# Altium PCB Smart_Connect_Board.PcbDoc (part 5 of 5)
Units mil, origin at the board's own origin, x right, y up, seen from the top; angles counter-clockwise.
Board outline 3543.31 x 3149.61 mil, 2 copper layers (Top Layer, Bottom Layer), stack 61.811 mil thick; 211 components, 139 nets, 660 pads, 247 vias.
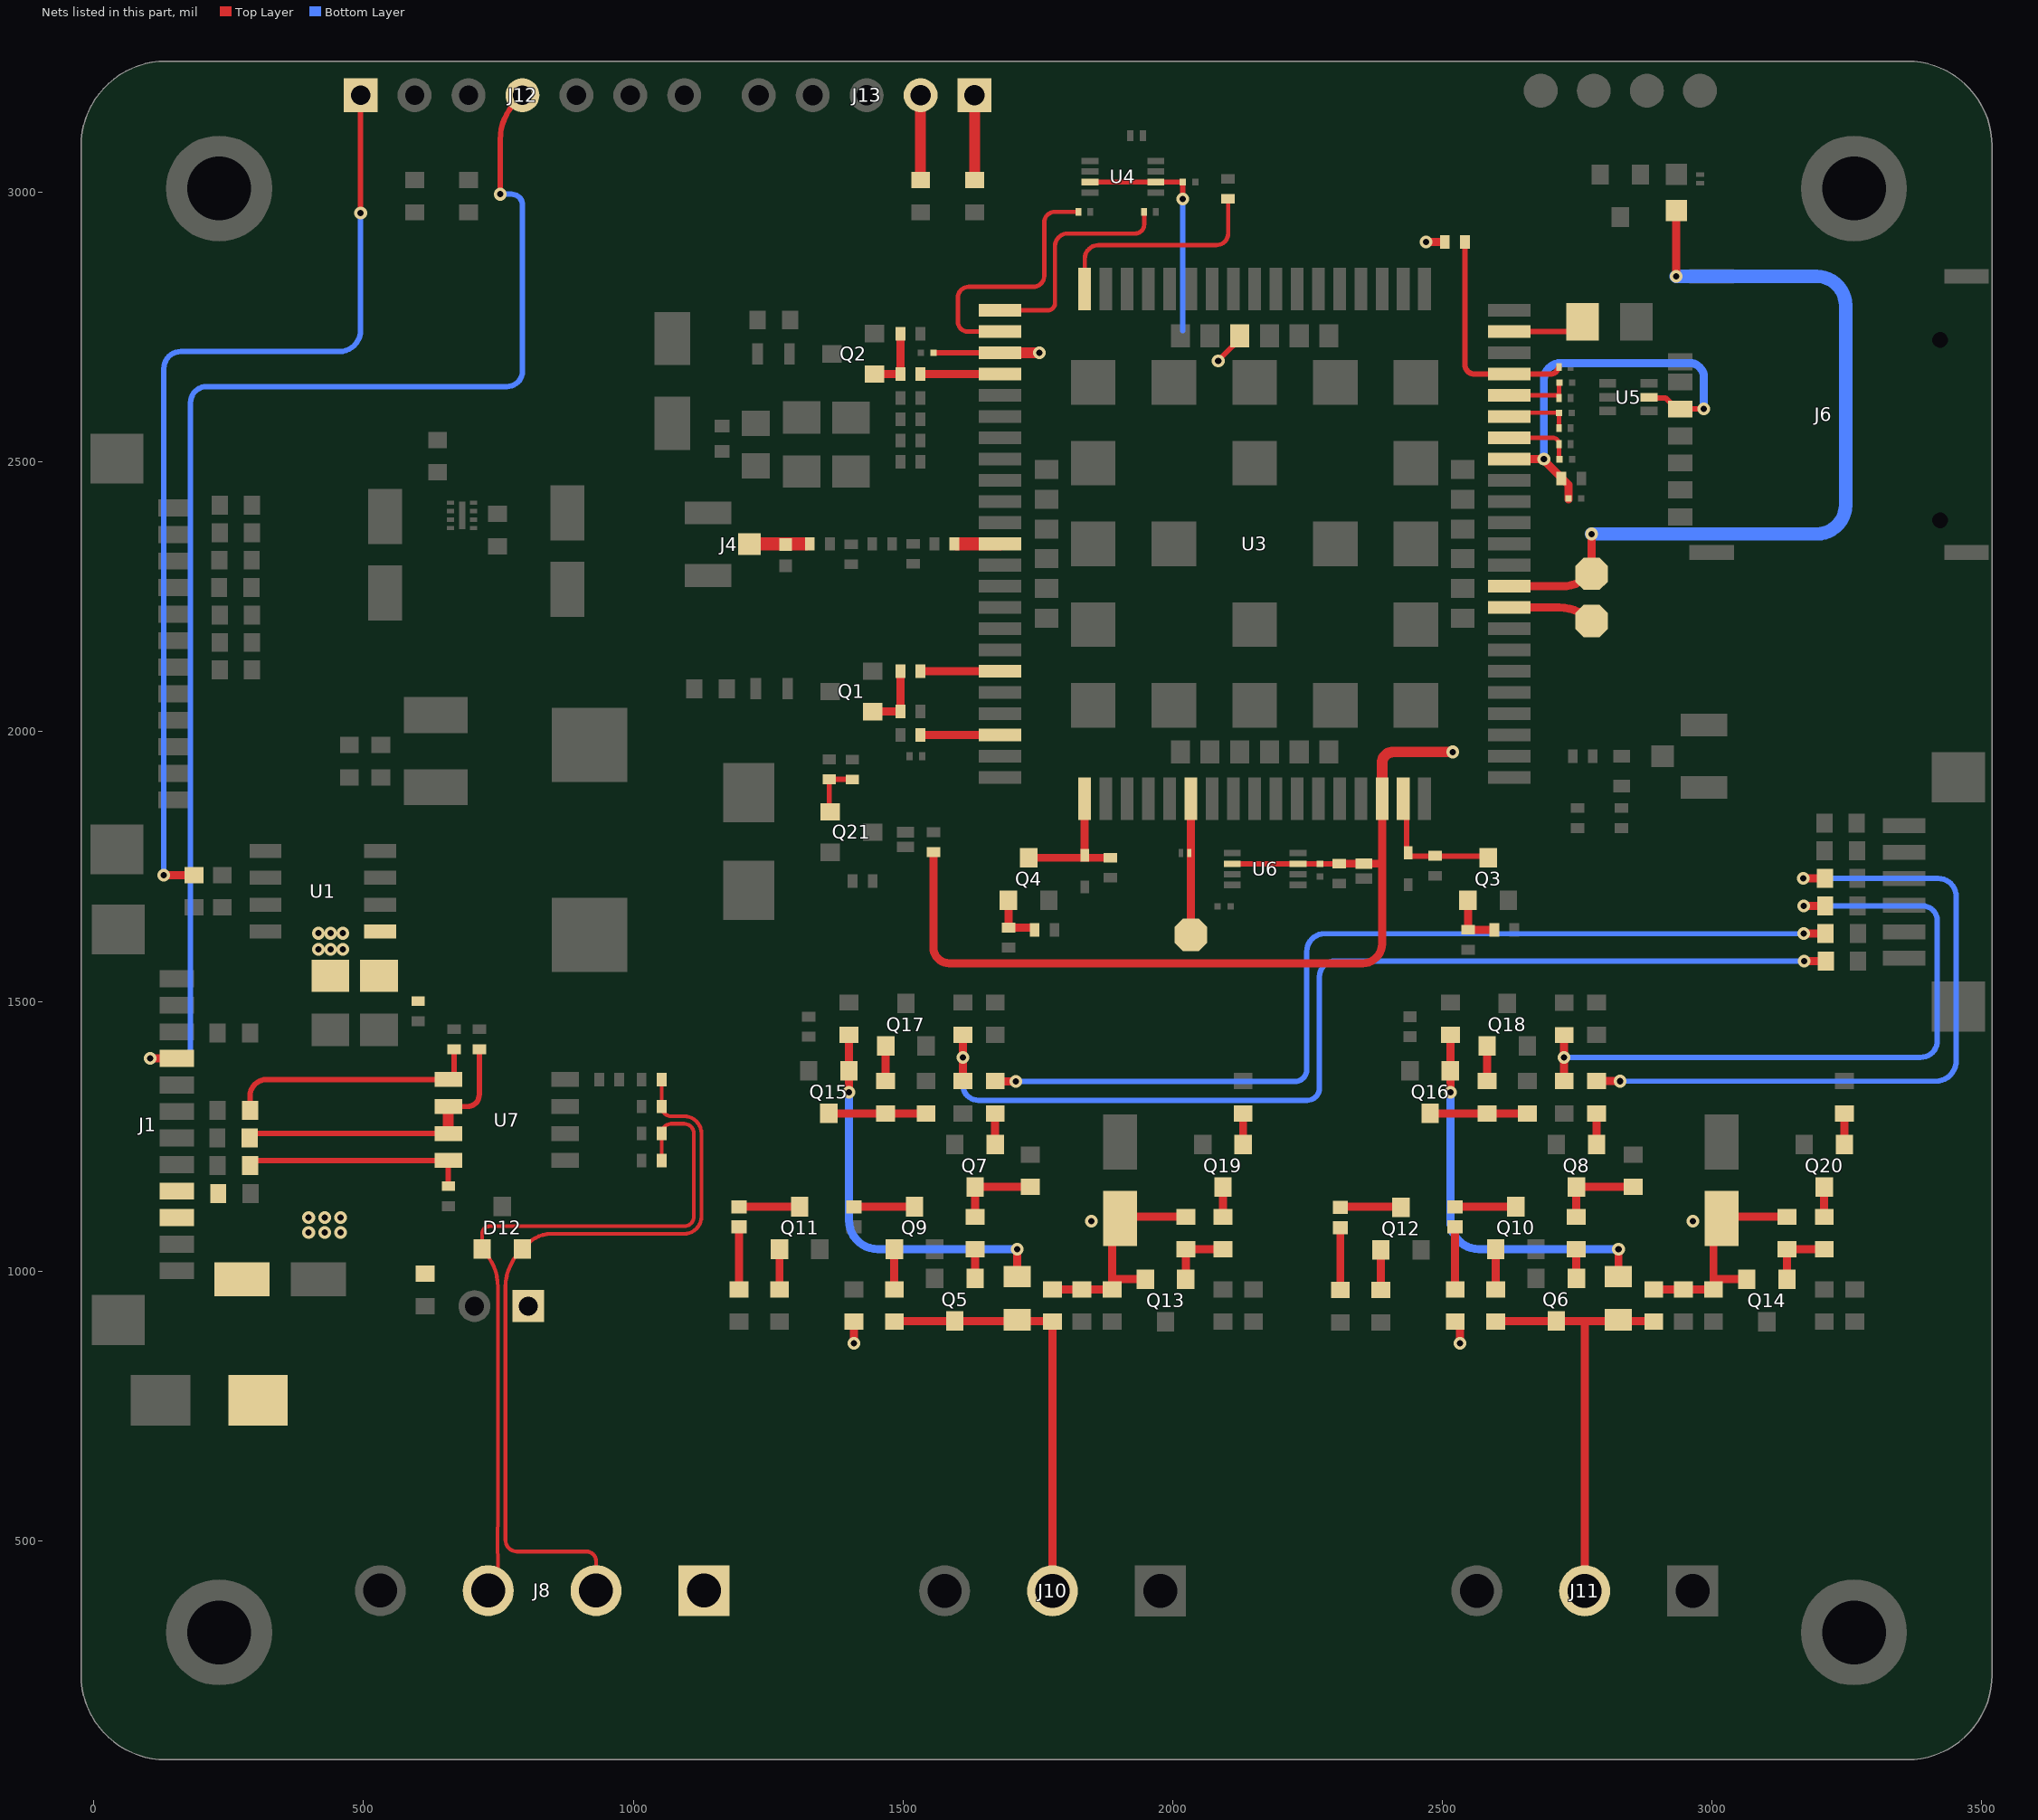
[diagram p3: the nets of this part, all layers, seen from the top]

## Via types
v1: diameter 23.62, hole 11.81, Top Layer to Bottom Layer, tented both sides, 233 vias
v2: diameter 23.62, hole 11.81, Top Layer to Bottom Layer, 14 vias

## Nets (pads, with @x,y where several pads share a name; then routed paths per layer and width w, separated by ;. In a path a pad name is that pad's centre, name@x,y a point inside that pad or via, vN(x,y) a via of type N, cw(c..) or ccw(c..) an arc to the next point about the centre after c; other vN are vias at no path point) (continued)
NetLED3_2: LED3.2 Q9.3 | length 112.6
  Top Layer w15: LED3.2@1409.04,1119.02 1409.15,1119.14 1521.45,1119.14 Q9.3@1521.56,1119.25
NetLED4_1: LED4.1 R55.2 | length 115.6
  Top Layer w15: R55.2@2524.04,966.02 LED4.1@2524.04,1081.63
NetLED4_2: LED4.2 Q10.3 | length 112.6
  Top Layer w15: LED4.2@2524.04,1119.03 2524.15,1119.14 2636.45,1119.14 Q10.3@2636.56,1119.25
NetLED5_1: LED5.1 R56.1 | length 115.6
  Top Layer w15: R56.1@1196.11,966.03 LED5.1@1196.1,1081.63
NetLED5_2: LED5.2 Q11.3 | length 112.6
  Top Layer w15: LED5.2@1196.1,1119.03 1196.21,1119.14 1308.53,1119.14 Q11.3@1308.64,1119.25
NetLED6_1: LED6.1 R57.1 | length 115.6
  Top Layer w15: R57.1@2311.11,966.03 LED6.1@2311.11,1081.62
NetLED6_2: LED6.2 Q12.3 | length 112.6
  Top Layer w15: LED6.2@2311.1,1119.03 2311.21,1119.14 2423.53,1119.14 Q12.3@2423.64,1119.25
NETLIGHT: R28.1 U3.52 | length 147.1
  Top Layer w15: R28.1@1532.56,2663.29 U3.52@1679.71,2663.29
NetQ1_1: Q1.1 R25.2 R26.2 | length 126.6
  Top Layer w15: Q1.1@1443.79,2037.31 R26.2@1495.56,2037.32 R25.2@1495.56,2112.11
NetQ2_1: Q2.1 R28.2 R29.2 | length 122.9
  Top Layer w15: Q2.1@1447.42,2663.29 R28.2@1495.56,2663.29 R29.2@1495.56,2738.09
NetQ3_1: Q3.1 R30.2 R31.2 | length 103.7
  Top Layer w15: Q3.1@2547.82,1687.59 R30.2@2547.82,1632.82 R31.2@2596.72,1632.82
NetQ4_1: Q4.1 R37.1 R38.2 | length 106.3
  Top Layer w15: R37.1@1695.74,1637.82 Q4.1@1695.74,1692.59 ; R37.1@1695.92,1636.99 1742.65,1636.99 1744.15,1635.49 R38.2@1744.15,1632.82
NetQ5_1: Q5.1 R58.1 | length 54.1
  Top Layer w15: Q5.1@1633.76,986.37 R58.1@1633.76,1040.51
NetQ6_1: Q6.1 R59.1 | length 54.1
  Top Layer w15: Q6.1@2748.76,986.37 R59.1@2748.76,1040.51
NetQ7_1: Q7.1 R50.1 | length 57.6
  Top Layer w15: Q7.1@1671.17,1234.76 R50.1@1671.17,1292.36
NetQ7_3: Q7.3 R51.2 R58.2 | length 158.1
  Top Layer w15: R58.2@1633.76,1100.51 Q7.3@1633.76,1156.02 R51.2@1736.32,1156.02
NetQ8_1: Q8.1 R52.1 | length 57.6
  Top Layer w15: Q8.1@2786.17,1234.76 R52.1@2786.17,1292.36
NetQ8_3: Q8.3 R53.2 R59.2 | length 158.1
  Top Layer w15: R59.2@2748.76,1100.51 Q8.3@2748.76,1156.02 R53.2@2851.32,1156.02
NetQ9_1: Q9.1 R60.1 | length 74.5
  Top Layer w15: R60.1@1484.16,966.02 Q9.1@1484.16,1040.51
NetQ10_1: Q10.1 R61.1 | length 74.5
  Top Layer w15: R61.1@2599.16,966.02 Q10.1@2599.16,1040.51
NetQ11_1: Q11.1 R62.1 | length 74.5
  Top Layer w15: R62.1@1271.23,966.02 Q11.1@1271.24,1040.51
NetQ12_1: Q12.1 R63.1 | length 74.5
  Top Layer w15: R63.1@2386.23,966.03 Q12.1@2386.23,1040.5
NetQ13_1: Q13.1 R64.1 R71.1 | length 124.7
  Top Layer w15: Q13.1@2024.44,984.76 R64.1@2024.44,1040.51 R71.1@2093.39,1040.51
NetQ14_1: Q14.1 R65.1 R73.1 | length 124.7
  Top Layer w15: Q14.1@3139.44,984.76 R65.1@3139.44,1040.51 R73.1@3208.39,1040.51
NetQ15_1: Q15.1 R66.1 R76.2 | length 737.1
  Top Layer w15: v1(1400.06,1331.73) Q15.1@1400.06,1371.1 R76.2@1400.06,1438.02 ; R66.1@1711.86,989.77 v1(1711.86,1040.51)
  Bottom Layer w15: v1(1400.06,1331.73) 1400.06,1093.98 ccw(c1453.53,1093.98) 1453.53,1040.51 v1(1711.86,1040.51)
NetQ15_3: Q15.3 R80.1 R82.2 | length 180.3
  Top Layer w15: Q15.3@1362.66,1292.36 R80.1@1468.12,1292.36 R82.2@1542.92,1292.36
NetQ16_1: Q16.1 R67.1 R78.2 | length 737.1
  Top Layer w15: v1(2515.06,1331.73) Q16.1@2515.06,1371.09 R78.2@2515.06,1438.02 ; R67.1@2826.86,989.77 v1(2826.86,1040.51)
  Bottom Layer w15: v1(2515.06,1331.73) 2515.06,1093.98 ccw(c2568.53,1093.98) 2568.53,1040.51 v1(2826.86,1040.51)
NetQ16_3: Q16.3 R81.1 R83.2 | length 180.3
  Top Layer w15: Q16.3@2477.65,1292.35 R81.1@2583.12,1292.36 R83.2@2657.91,1292.36
NetQ17_1: Q17.1 R80.2 | length 65.3
  Top Layer w15: R80.2@1468.12,1352.36 Q17.1@1468.12,1417.67
NetQ18_1: Q18.1 R81.2 | length 65.3
  Top Layer w15: R81.2@2583.12,1352.36 Q18.1@2583.12,1417.67
NetQ19_1: Q19.1 R70.1 | length 57.6
  Top Layer w15: Q19.1@2130.8,1234.76 R70.1@2130.8,1292.36
NetQ19_3: Q19.3 R71.2 | length 55.5
  Top Layer w15: R71.2@2093.39,1100.51 Q19.3@2093.4,1156.02
NetQ20_1: Q20.1 R72.1 | length 57.6
  Top Layer w15: Q20.1@3245.8,1234.76 R72.1@3245.8,1292.36
NetQ20_3: Q20.3 R73.2 | length 55.5
  Top Layer w15: R73.2@3208.39,1100.51 Q20.3@3208.4,1156.02
NetQ21_1: Q21.1 R90.2 R91.2 | length 104.6
  Top Layer w10: Q21.1@1365.05,1851.28 cw(c1365.05,1852.91) 1363.42,1852.91 R90.2@1363.42,1911.78 1406.26,1911.78 R91.2@1406.26,1911.39
NetR20_1: R20.1 U3.98 | length 147.1
  Top Layer w15: R20.1@1532.56,1994 U3.98@1679.71,1994
NetR21_1: R21.1 U3.96 | length 490
  Top Layer w8: U3.96@1679.71,2742.03 1619.97,2742.03 cw(c1619.97,2760) 1602,2760 1602,2805 cw(c1622,2805) 1622,2825 1742,2825 ccw(c1742,2845) 1762,2845 1762,2944.06 cw(c1782,2944.06) 1782,2964.06 R21.1@1825.72,2964.06
NetR22_1: R22.1 U3.95 | length 420
  Top Layer w8: U3.95@1679.71,2781.4 1768.4,2781.4 ccw(c1768.4,2795) 1782,2795 1782,2900.27 cw(c1805.54,2900.27) 1805.54,2923.81 1930.89,2923.81 ccw(c1930.89,2940.27) 1947.35,2940.27 1947.35,2956.77
NetR92_2: R92.2 U3.93 | length 117.4
  Top Layer w10: U3.93@2624.59,2742.03 R92.2@2742.02,2742.03
NetR95_2: R95.2 U3.51 | length 412.9
  Top Layer w8: U3.51@1837.19,2820.77 1837.19,2876.78 cw(c1862.7,2876.78) 1862.7,2902.29 2081.5,2902.29 ccw(c2081.5,2923.81) 2103.02,2923.81 R95.2@2103.01,2988.06
PWRKEY: C30.2 D11.2 Q4.3 U3.1 | length 261.3
  Top Layer w15: Q4.3@1733.15,1766.33 D11.2@1836.15,1766.33 ; U3.1@1837.19,1875.89 1837.19,1768.84 cw(c1833.64,1768.84) D11.2@1836.15,1766.33 ; C30.2@1884.63,1766.33 1837.19,1766.33 D11.2@1836.15,1766.33
RE/DE/RS485/T: R12.1 R40.1 U7.2 U7.3 | length 577.2
  Top Layer w10: R12.1@288.85,1246.67 cw(c297.24,1246.67) 297.24,1255.05 U7.3@657.23,1255.05 ; U7.2@657.23,1305.05 692.5,1305.05 ccw(c692.5,1327.05) 714.5,1327.05 R40.1@714.5,1411.28
  Top Layer w20: U7.3@657.23,1255.05 U7.2@657.23,1305.05
RF_ANT: C47.2 U3.60 | length 80.4
  Top Layer w25: C47.2@1599.3,2348.33 U3.60@1679.71,2348.33
RF_ANT_O: D4.2 J4.1 R93.1 | length 107.4
  Top Layer w10: D4.2@1282.68,2347.28 cw(c1283.74,2347.28) D4.2@1283.74,2348.33
  Top Layer w25: J4.1@1215.5,2348.33 1283.74,2348.33 R93.1@1321.26,2348.33
RS485_N: D12.2 J8.2 J9.1 R43.2 R44.2 | length 1474.5
  Top Layer w7: J9.1@794.47,946.16 ccw(c805.57,946.16) J9.1@805.57,935.05 ; J8.2@931.04,407.34 931.04,462.05 ccw(c913.16,462.05) 913.16,479.92 784.28,479.92 cw(c784.28,501.17) 763.04,501.17 763.04,969.89 cw(c858.07,969.89) 790.87,1037.09 D12.2@794.47,1040.69 804.85,1051.07 cw(c848.17,1007.75) 848.17,1069.01 1094.35,1069.01 ccw(c1094.35,1101.05) 1126.39,1101.05 1126.39,1255.05 ccw(c1094.38,1255.05) 1094.38,1287.05 1082.47,1287.05 1070.56,1287.05 cw(c1070.56,1305.05) R44.2@1052.56,1305.05 ; R44.2@1052.56,1307.15 R43.2@1052.56,1355.05
RS485_P: D12.1 J8.3 R45.1 R46.2 R47.1 | length 1369.8
  Top Layer w7: J8.3@731.04,407.34 ccw(c687.58,450.79) 749.04,450.79 748.52,501.95 cw(c762.52,502.1) 748.52,502.1 748.52,521.58 cw(c762.52,521.58) 748.56,522.66 749.02,528.52 ccw(c742.04,529.02) 749.04,529.02 749.04,969.89 ccw(c649.04,969.89) 719.75,1040.6 D12.1@719.66,1040.69 719.66,1069.01 cw(c733.66,1069.01) 733.66,1083.01 1094.35,1083.01 ccw(c1094.35,1101.05) 1112.39,1101.05 1112.39,1255.05 ccw(c1094.38,1255.05) 1094.38,1273.05 1070.56,1273.05 ccw(c1070.56,1255.05) R46.2@1052.56,1255.05 R47.1@1052.56,1205.05
RST_GSM: C24.2 D9.2 Q3.3 U3.16 | length 261.2
  Top Layer w10: U3.16@2427.74,1875.89 2434.05,1869.57 2434.05,1770.78 2435.7,1769.13 2486.98,1769.13 2582.41,1769.13 cw(c2582.41,1766.33) Q3.3@2585.22,1766.33
RX_AUX: J13.2 R86.1 | length 157.2
  Top Layer w20: R86.1@1532.78,3023.03 J13.2@1532.78,3180.22
RXD/RS485/RS232/T: R9.1 R39.1 U7.1 | length 474
  Top Layer w10: R9.1@289.36,1297.88 289.36,1324.71 cw(c319.7,1324.71) 319.7,1355.05 U7.1@657.23,1355.05 667.5,1361.33 R39.1@667.5,1411.28
RXIN1: R11.1 R74.2 R77.2 | length 1989.2
  Top Layer w15: R77.2@1611.17,1352.36 R74.2@1611.18,1438.02 ; v1(3171.02,1574.77) v1(3171.02,1574.77) R11.1@3211.19,1574.85
  Bottom Layer w10: v1(1611.17,1396.11) 1611.17,1345.14 ccw(c1639.81,1345.14) 1639.81,1316.5 2249.51,1316.5 ccw(c2249.51,1339.45) 2272.46,1339.45 2272.46,1546.21 cw(c2301.02,1546.21) 2301.02,1574.77 v1(3171.02,1574.77)
RXIN2: R16.1 R75.2 R79.2 | length 1321.6
  Top Layer w15: R79.2@2726.18,1352.36 R75.2@2726.18,1438.02 ; v1@3170,1677.02 R16.1@3210.18,1677.02
  Bottom Layer w10: v1(2726.17,1396.11) 3386.91,1396.11 ccw(c3386.91,1427.29) 3418.09,1427.29 3418.09,1649.55 ccw(c3390.63,1649.55) 3390.63,1677.02 v1@3170,1677.02
  other v1: 3170,1676.94
SCK_NFC: J12.1 R1.1 | length 1836.5
  Top Layer w10: v1(494.54,2961.71) J12.1@494.54,3180.22
  Top Layer w15: v2(129.52,1734.2) R1.1@185.54,1734.23
  Bottom Layer w10: v2(129.52,1734.2) 129.52,2673.11 cw(c161.41,2673.11) 161.41,2705 455,2705 ccw(c455,2744.54) 494.54,2744.54 v1(494.54,2961.71)
SIM_CD: R32.2 R33.2 U3.34 | length 418.1
  Top Layer w10: R32.2@2542.06,2908.28 2542.06,2680.85 ccw(c2559.63,2680.85) 2559.63,2663.29 U3.34@2624.59,2663.29 2701.57,2663.29 ccw(c2701.57,2676.29) 2712.85,2669.82 2716.29,2675.74 R33.2@2716.6,2676.29
SIM_CLK: C28.2 R35.2 U3.32 | length 124.5
  Top Layer w8: U3.32@2624.59,2584.55 cw(c2631.4,2584.55) 2631.4,2591.36 C28.2@2716.6,2591.36 R35.2@2716.6,2562.78
SIM_DATA: C27.2 R36.2 U3.31 | length 127.1
  Top Layer w8: U3.31@2624.59,2545.18 2704.6,2545.18 cw(c2704.6,2533.18) R36.2@2716.6,2533.18 2716.6,2507.63 ccw(c2720.07,2507.63) C27.2@2717.62,2505.17
SIM_RST: C29.2 R34.2 U3.33 | length 123.8
  Top Layer w8: U3.33@2624.59,2623.92 2711.6,2623.92 cw(c2711.6,2618.92) R34.2@2716.6,2618.92 2716.6,2646.26 cw(c2717.62,2646.26) C29.2@2717.62,2647.27
SIM_VDD: C23.1 C43.2 J6.C1 U3.30 U5.5 | length 804.1
  Top Layer w10: U5.5@2883.32,2620.29 2884.52,2619.1 2914.07,2619.1 2934.79,2598.37 J6.C1@2941.49,2598.37 v2(2985.25,2598.37)
  Top Layer w15: U3.30@2624.59,2505.81 v1(2688.52,2505.81) 2688.52,2503.47 2698.21,2493.78 2698.21,2493.68 2734.32,2457.56 C23.1@2734.32,2430.7
  Bottom Layer w15: v1(2688.52,2505.81) 2688.52,2652.4 cw(c2719.69,2652.4) 2719.69,2683.57 2959.16,2683.57 cw(c2959.16,2657.48) 2985.25,2657.48 v2(2985.25,2598.37)
SS_NFC: J1.4 J12.4 | length 2538
  Top Layer w10: v2(753.33,2996.65) 753.33,3097.59 cw(c853.33,3097.59) 782.62,3168.3 J12.4@794.54,3180.22
  Top Layer w15: v1(104,1394.3) J1.4@153.68,1394.3
  Bottom Layer w10: v1(104,1394.3) 159.37,1394.3 ccw(c159.37,1414.08) 179.15,1414.08 179.15,2610.15 cw(c209,2610.15) 209,2640 765.82,2640 ccw(c765.82,2668.72) 794.54,2668.72 794.54,2976.78 ccw(c774.66,2976.78) 774.66,2996.65 v2(753.33,2996.65)
STATUS: R25.1 U3.66 | length 147.2
  Top Layer w15: R25.1@1532.56,2112.11 U3.66@1679.71,2112.11
TX_AUX: J13.1 R88.1 | length 157.2
  Top Layer w20: R88.1@1632.78,3023.03 J13.1@1632.78,3180.22
TXD/RS485/RS232/T: R15.1 R42.1 U7.4 | length 421.1
  Top Layer w10: R15.1@289.36,1195.45 cw(c298.96,1195.45) 298.96,1205.05 U7.4@657.23,1205.05 R42.1@657.23,1157.28
TXIN1: R14.1 R50.2 | length 1790.5
  Top Layer w15: R50.2@1671.17,1352.36 1671.71,1351.82 1708.96,1351.82 v1(1709.5,1351.28) ; v1(3170.51,1625.86) R14.1@3210.68,1625.93
  Bottom Layer w10: v1(1709.5,1351.28) 2226.66,1351.28 ccw(c2226.66,1373.31) 2248.69,1373.31 2248.69,1592.35 cw(c2281.74,1592.35) 2281.74,1625.41 v1@3170.51,1625.41
TXIN2: R17.1 R52.2 | length 1336.2
  Top Layer w15: R52.2@2786.17,1352.36 2786.36,1352.17 2829.88,1352.17 v1(2830.07,1351.98) ; v1@3169.49,1728.1 R17.1@3209.67,1728.1
  Bottom Layer w10: v1(2830.07,1351.98) 3415.03,1351.98 ccw(c3415.03,1390.04) 3453.09,1390.04 3453.09,1694.56 ccw(c3419.63,1694.56) 3419.63,1728.03 v1(3169.49,1728.03)
UART_LOG_TX: P3.1 U3.23 | length 159.2
  Top Layer w15: U3.23@2624.59,2230.22 2716.79,2230.22 cw(c2716.79,2144.86) P3.1@2777.15,2205.22
USB_BOOT: D13.2 P2.1 U3.6 | length 252.6
  Top Layer w15: P2.1@2034.04,1623.33 U3.6@2034.04,1875.89
USB_VBUS: F1.1 P1.1 U3.24 | length 1570.7
  Top Layer w15: U3.24@2624.59,2269.59 2721.14,2269.59 ccw(c2721.14,2348.78) P1.1@2777.15,2292.78 v1(2777.15,2366.73) ; v1(2934.08,2844.44) F1.1@2934.08,2966.23
  Bottom Layer w25: v1(2777.15,2366.73) 3194.28,2366.73 ccw(c3194.28,2420.49) 3248.03,2420.49 3248.03,2790.3 ccw(c3193.9,2790.3) 3193.9,2844.44 v1(2934.08,2844.44)
VCC: C4.2 C5.2 C6.2 C7.2 C8.1 C36.1 C37.1 C38.2 C39.2 D2.2 J1.9 J1.10 J8.1 Q13.2 Q14.2 R48.1 R49.1 R54.1 R55.1 R64.2 R65.2 SB1.2 SB2.2 U1.1 | length 940
  Top Layer w15: v1(1409.04,866.28) R54.1@1409.04,906.02 ; R48.1@1777.35,966.02 SB1.2@1888.03,966.02 1888.03,986.02 ; Q13.2@1949.64,984.76 1889.28,984.76 1888.03,986.02 ; R64.2@2024.44,1100.51 1911.02,1100.51 1903.04,1092.53 1888.03,1077.52 1888.03,986.02 ; v1(2533.04,866.28) R55.1@2533.04,906.02 ; R49.1@2892.35,966.02 SB2.2@3003.03,966.02 3003.03,986.02 ; Q14.2@3064.63,984.76 3004.28,984.76 3003.03,986.02 ; R65.2@3139.44,1100.51 3026.02,1100.51 3003.03,1077.52 3003.03,986.02
  other v1: 398.1,1071.6 427.6,1071.6 457.1,1071.6 1849.54,1092.53 2964.54,1092.53 398.1,1099.1 427.6,1099.1 457.1,1099.1 416.16,1596.78 438.66,1596.78 461.16,1596.78 416.16,1626.28 438.66,1626.28 461.16,1626.28
VDD_EXT: C13.1 C21.1 C25.2 C31.1 D6.1 R32.1 R41.2 U3.15 U3.97 U3.116 U4.3 U4.6 U6.3 U6.6 | length 2542.9
  Top Layer w10: C21.1@1556.86,2702.66 U3.97@1679.71,2702.66 ; U4.3@1846.95,3019.21 U4.6@1969,3019.21 C25.2@2018.95,3019.21 v2(2018.95,2988.06) ; v1@2084.67,2686.83 v1(2084.67,2687.83) 2084.67,2688.38 2111.87,2715.58 2111.87,2721.44 U3.116@2124.59,2734.15 ; U6.6@2110.81,1755.36 2208.76,1755.36 ; 2209.76,1755.36 U6.3@2232.85,1755.36 C31.1@2273.41,1755.36 C13.1@2309.13,1755.36 C13.1@2320.13,1755.36
  Top Layer w15: R41.2@1556.46,1776.87 1556.46,1600.06 ccw(c1585.73,1600.06) 1585.73,1570.79 2352.88,1570.79 ccw(c2352.88,1606.28) 2388.37,1606.28 2388.37,1755.36 ; C13.1@2320.13,1755.36 2388.37,1755.36 ; U3.15@2388.37,1875.89 2388.37,1755.36 ; v1(2470.17,2908.28) R32.1@2505.06,2908.28
  Top Layer w20: U3.97@1679.71,2702.66 v1(1753.12,2702.66) ; U3.15@2388.37,1875.89 2388.37,1941.38 cw(c2409.49,1941.38) 2409.49,1962.5 v1(2519.56,1962.5)
  Bottom Layer w10: 2018.95,2744 v2(2018.95,2988.06)
WBUS1: J10.2 Q5.3 R48.2 R60.2 R66.2 | length 792.6
  Top Layer w15: R60.2@1484.16,906.83 1711.86,906.83 1776.55,906.83 R48.2@1777.35,906.02 J10.2@1777.35,406.98
WBUS2: J11.2 Q6.3 R49.2 R61.2 R67.2 | length 793.4
  Top Layer w15: R61.2@2599.16,906.83 2764.24,906.83 ; J11.2@2764.24,406.98 2764.24,906.83 ; R49.2@2892.35,906.02 2891.55,906.83 2764.24,906.83
pads on no net: J2.8 J6.C6 J6.MH U3.3 U3.4 U3.5 U3.7 U3.8 U3.11 U3.12 U3.13 U3.14 U3.19 U3.20 U3.21 U3.22 U3.25 U3.26 U3.35 U3.36 U3.37 U3.38 U3.40 U3.41 U3.42 U3.43 U3.44 U3.47 U3.48 U3.49 U3.50 U3.53 U3.67 U3.68 U3.100 U3.101 U3.102 U3.103 U3.104 U3.105 U3.106 U3.107 U3.108 U3.109 U3.110 U3.111 U3.112 U3.113 U3.114 U3.115 U3.117 U3.118 U3.119 U3.120 U3.121 U3.122 U3.123 U3.124

## Polygon pours and split planes (outlines as drawn)
GND on Bottom Layer "NONET_L-01_P-001" (solid, remove dead copper, pour order 16): -23.91,251.26 -23.91,3085.91 cw(c133.57,3085.91) 133.57,3243.39 3361.92,3243.39 cw(c3361.92,3085.91) 3519.4,3085.91 3519.4,251.26 cw(c3361.92,251.26) 3361.92,93.78 133.57,93.78 cw(c133.57,251.26)
3V3 on Bottom Layer "NONET_L-01_P-001" (solid, remove dead copper, pour order 15): 469.77,1835.27 225.91,1835.27 225.91,1294 69,1294 69,2728 494.54,2728 494.54,3026 943.95,3026 943.95,3243.39 -23.91,3243.39 -23.91,1154 359,1154 359,1701.27 420,1701.27
VCC on Bottom Layer "NONET_L-01_P-001" (solid, pour order 8): 400.38,1653.08 ccw(c400.38,1622.84) 370.13,1622.84 370.13,1224.24 370.13,1003.08 506.95,1003.08 506.95,1617.87 ccw(c471.74,1617.87) 471.73,1653.08
VDD_EXT on Bottom Layer "NONET_L-01_P-001" (solid, pour order 12): 2546.29,2944.28 cw(c2546.29,2918.1) 2572.46,2918.1 2572.46,2770.28 2572.46,1942.28 cw(c2546.46,1942.27) 2546.46,1916.28 2502.46,1916.28 cw(c2502.46,1940.27) 2478.46,1940.28 2478.46,2650.28 ccw(c2452.46,2650.28) 2452.46,2676.28 1723.15,2676.28 cw(c1723.15,2699.94) 1699.48,2699.94 1699.48,2741.73 cw(c1722.03,2741.73) 1722.03,2764.28 2371.1,2764.28 ccw(c2371.1,2793.35) 2400.18,2793.35 2400.18,2920 cw(c2424.46,2920) 2424.46,2944.28
GND on Top Layer "NONET_L-01_P-001" (solid, remove dead copper, pour order 17): -23.91,251.26 -23.91,3085.91 cw(c133.57,3085.91) 133.57,3243.39 3361.92,3243.39 cw(c3361.92,3085.91) 3519.4,3085.91 3519.4,251.26 cw(c3361.92,251.26) 3361.92,93.78 133.57,93.78 cw(c133.57,251.26)
VCC on Top Layer "NONET_L-01_P-001" (solid, remove dead copper, pour order 14): 481,1116.08 481,1029.72 346.7,1029.72 346.7,943.36 393.31,943.36 393.31,343.69 ccw(c452,343.69) 452,285 1022,285 ccw(c1022,330) 1067,330 1067,456.28 1262,456.28 1262,93.78 133.57,93.78 cw(c133.57,251.26) -23.91,251.26 -23.91,654.28 178.31,654.28 ccw(c178.31,697.79) 221.82,697.79 221.82,1042.85 ccw(c181.39,1042.85) 181.39,1083.28 121.8,1083.28 121.79,1163.99 265.36,1163.99 265.36,1116.08

## Other copper
Top Layer:
  rectangle net RS485_N: 800.87,935.05 807.87,1037.09
  rectangle net 3V3_GSM: 654.25,2348.16 667.84,2381.46
  rectangle net GSM_PWR: 635.92,2389.33 667.84,2397.2
  rectangle net GND: 676.69,2364.98 710.95,2378.2
  rectangle net GND: 687.96,2332.55 697.36,2368.62
  region net 3V3: 781.21,3009.12 781.21,3130.48 787.76,3128.72 801.32,3128.72 814.42,3132.23 826.16,3139.01 835.75,3148.6 842.53,3160.34 846.03,3173.44 846.03,3187 842.53,3200.1 835.75,3211.84 826.16,3221.43 821.25,3224.26 823.13,3231.26 965.95,3231.26 967.82,3224.26 962.92,3221.43 953.33,3211.84 946.55,3200.1 943.04,3187 943.04,3173.44 946.55,3160.34 953.33,3148.6 962.92,3139.01 974.66,3132.23 987.76,3128.72 1001.32,3128.72 1014.42,3132.23 1026.16,3139.01 1035.75,3148.6 1040.5,3156.83 1048.58,3156.83 1053.33,3148.6 1062.92,3139.01 1074.66,3132.23 1079.2,3131.02 1079.2,3097.97 1079.31,3097.39 1077.69,3089.23 1072.74,3081.82 1065.33,3076.87 1057.18,3075.25 1056.59,3075.37 856.53,3075.37 853.33,3078.56 845.31,3081.88 836.64,3081.88 828.62,3078.56 822.49,3072.43 819.16,3064.41 819.16,3055.73 822.49,3047.72 828.62,3041.58 836.64,3038.26 845.31,3038.26 853.33,3041.58 856.53,3044.78 1056.59,3044.78 1056.59,3044.62 1070.4,3046.43 1083.27,3051.76 1094.32,3060.24 1102.8,3071.29 1108.13,3084.16 1109.95,3097.97 1109.79,3097.97 1109.79,3130.99 1114.42,3132.23 1126.16,3139.01 1135.75,3148.6 1142.53,3160.34 1143.75,3164.92 1183.57,3164.92 1184.79,3160.34 1191.57,3148.6 1201.16,3139.01 1212.9,3132.23 1226,3128.72 1239.56,3128.72 1252.66,3132.23 1264.4,3139.01 1273.99,3148.6 1278.74,3156.83 1286.82,3156.83 1291.57,3148.6 1301.16,3139.01 1312.9,3132.23 1326,3128.72 1339.56,3128.72 1352.66,3132.23 1364.4,3139.01 1373.99,3148.6 1380.77,3160.34 1384.28,3173.44 1384.28,3187 1380.77,3200.1 1373.99,3211.84 1364.4,3221.43 1359.5,3224.26 1361.37,3231.26 1480.73,3231.26 1480.73,3009.12
  region net 3V3: 987.88,2042.16 988.97,2042.16 988.97,1714.28 450.3,1714.28 444.72,1715.38 439.47,1717.56 434.74,1720.72 430.72,1724.74 427.56,1729.47 425.39,1734.72 424.28,1740.3 424.28,1743.14 424.28,1914.9 424.28,1917.6 425.33,1922.9 427.4,1927.89 430.4,1932.38 434.22,1936.2 438.71,1939.21 443.71,1941.27 449.01,1942.33 816.1,1942.33 819.34,1942.49 825.71,1943.75 831.7,1946.24 837.1,1949.85 841.69,1954.44 845.3,1959.83 847.78,1965.83 849.05,1972.2 849.21,1975.44 849.21,2042.34 986.96,2042.34 hole: 552.19,1844.82 543.51,1844.82 535.49,1841.5 529.36,1835.37 526.04,1827.35 526.04,1818.68 529.36,1810.66 530.01,1810.01 530.01,1802.26 491.05,1802.26 491.05,1756.28 570.1,1756.28 570.1,1802.26 565.69,1802.26 565.69,1810.01 566.34,1810.66 569.66,1818.68 569.66,1827.35 566.34,1835.37 560.2,1841.5
  region net RS485_P: 612.33,999.39 701.02,999.39 ccw(c701.02,1005.26) 706.89,1005.26 706.89,1040.69 713.89,1040.69 713.89,1004.85 cw(c701.43,1004.85) 701.43,992.39 616.94,992.39 cw(c616.94,995.05) 614.28,995.05 614.28,997.45 ccw(c612.33,997.45)
  region net VCC: 631.64,1509.22 cw(c613.69,1509.22) 613.69,1491.28 404.58,1491.28 404.58,1642.26 500.98,1642.26 631.64,1642.26
  region net NetD1_2: 1223.31,1554.18 ccw(c1223.36,1592.15) 1261.33,1592.21 1261.33,1784.19 1009.46,1784.19 1009.46,1697.28 501.05,1697.28 501.05,1656.28 646.43,1656.28 646.43,1554.18 754.56,1554.18
  region net VCC: 3156.94,1085.51 cw(c3145.81,1085.51) 3145.81,1074.37 3099.45,1074.37 ccw(c3099.39,1060.88) 3085.9,1060.94 3085.9,967.89 cw(c3069.03,967.89) 3069.03,951.02 2874.85,951.02 2874.85,981.02 2914.72,981.02 ccw(c2914.72,995.85) 2929.54,995.85 2929.54,1126.21 cw(c2947.04,1126.21) 2947.04,1143.71 3144.57,1143.71 cw(c3144.58,1131.34) 3156.94,1131.34
  region net 3V3_GSM: 620.01,2414.75 ccw(c620.01,2409.47) 614.73,2409.47 614.84,2404.04 557.81,2404.04 555.76,2403.83 551.98,2402.27 549.38,2399.67 549.08,2399.37 547.51,2395.58 547.31,2393.53 547.31,2338.12 547.31,2335.97 545.66,2331.98 542.6,2328.93 536.46,2327.28 429.46,2327.28 427.07,2327.28 422.66,2329.1 419.28,2332.48 417.46,2336.89 417.46,2339.28 417.46,2482.28 417.46,2485.06 419.59,2490.21 423.53,2494.14 428.67,2496.28 431.46,2496.27 653.94,2496.28 656.71,2496.28 661.81,2494.16 665.72,2490.25 666.28,2488.9 667.84,2482.38 667.84,2475.91 667.84,2408.92 654.25,2408.92 654.25,2414.75
  region net GSM_PWR: 952.83,2354.32 cw(c952.83,2318.18) 988.97,2318.18 988.97,2062.73 991.85,2062.16 1128.22,2062.16 1128.22,2258.53 1085.49,2258.53 1085.49,2320.66 1128.22,2320.66 1128.22,2374.67 1085.49,2374.67 1085.49,2390.44 1074.78,2390.44 1071.58,2387.25 1063.56,2383.93 1054.89,2383.93 1046.87,2387.25 1040.74,2393.38 1037.42,2401.4 1037.42,2410.08 1040.74,2418.09 1046.87,2424.23 1054.89,2427.55 1063.56,2427.55 1071.58,2424.23 1074.78,2421.03 1085.49,2421.03 1085.49,2436.8 1128.22,2436.8 1128.22,2548.15 1253.13,2548.15 1253.13,2631.28 1188.8,2631.28 1188.8,2784.39 1205.66,2784.39 1205.66,2790.89 1255.66,2790.89 1255.66,2784.39 1275.66,2784.39 1275.66,2745.89 1305.66,2745.89 1305.66,2811.98 1125.96,2811.98 1125.96,2666.28 730.46,2666.28 ccw(c730.46,2633.18) 697.36,2633.18 697.36,2389.02 790,2389.02 790,2354.32
  region net GND: 1182.32,2414.82 ccw(c1188.94,2414.82) 1188.94,2408.21 1601.73,2408.21 ccw(c1600.78,2421.96) 1614.53,2422.91 1614.53,2438.88 1719.08,2438.88 1719.08,2403.83 cw(c1685.39,2403.83) 1685.39,2370.14 1246.57,2370.14 1246.57,2386.67 1182.32,2386.67
  region net NetC14_2: 1595.69,2448.88 1595.69,2422.73 1201.16,2422.62 1201.16,2516.65 1476.56,2516.65 1476.56,2478.31 1514.56,2478.31 1514.56,2635.73 1630.34,2635.73 1630.34,2562.74 1719.08,2562.74 1719.08,2448.88
  region net GSM_PWR: 314.02,1938.56 cw(c314.02,1919.28) 333.31,1919.27 333.31,1876.28 cw(c314.88,1876.27) 314.88,1857.85 119.49,1857.85 119.49,1938.56
  region net VCC: 2041.94,1085.51 cw(c2030.81,1085.51) 2030.81,1074.37 1984.45,1074.37 ccw(c1984.39,1060.88) 1970.9,1060.94 1970.9,967.89 cw(c1954.03,967.89) 1954.03,951.02 1759.85,951.02 1759.85,981.02 1799.72,981.02 ccw(c1799.72,995.85) 1814.54,995.85 1814.54,1126.21 cw(c1832.04,1126.21) 1832.04,1143.71 2029.57,1143.71 cw(c2029.58,1131.34) 2041.94,1131.34
Bottom Layer:
  rectangle net 3V3: 844.89,1128.46 907.9,1180.86
  rectangle net 3V3: 726.45,1127.46 789.46,1179.86
  rectangle net 3V3: 1512.61,1208.43 1575.62,1260.82
  rectangle net 3V3: 1519.56,1058.16 1582.57,1110.55
  rectangle net 3V3: 1515.41,1425.15 1590.18,1486.91
  region net 3V3: 239 vertices and 5 holes, not listed, extent 420,766.67 2904.46,1836.27
  region net GSM_PWR: 253.05,1834 cw(c253.05,1866.63) 220.41,1866.63 220.41,2461.41 cw(c285.28,2461.41) 285.28,2526.28 576.73,2526.28 905.46,2526.28 908.41,2526.28 914.21,2525.12 919.67,2522.86 924.58,2519.58 928.76,2515.4 932.04,2510.49 934.3,2505.03 935.31,2499.97 935.46,2496.28 935.46,2395.05 935.46,2392.22 934.35,2386.66 932.18,2381.42 929.03,2376.71 925.03,2372.7 920.31,2369.55 915.08,2367.38 910.59,2366.49 906.68,2366.28 722.81,2366.28 722.64,2366.68 716.51,2372.82 708.49,2376.14 699.82,2376.14 691.8,2372.82 685.66,2366.68 685.5,2366.28 673.77,2366.28 673.4,2366.65 665.38,2369.97 656.71,2369.97 648.69,2366.65 648.32,2366.28 539.22,2366.28 538.85,2366.65 530.83,2369.97 522.15,2369.97 514.14,2366.65 513.76,2366.28 377.28,2366.28 ccw(c377.27,2329) 340,2329 340,1867 cw(c307,1867) 307,1834
  region net VCC: 1200.14,783.56 1008.79,783.56 1008.79,487.94 1008.79,482.36 1010.97,471.41 1015.24,461.1 1021.44,451.82 1029.34,443.93 1038.62,437.72 1048.93,433.45 1059.88,431.28 1065.46,431.28 1450.46,431.28 1454.89,431.27 1463.58,433 1471.77,436.4 1479.14,441.32 1485.41,447.59 1490.34,454.96 1493.73,463.15 1495.46,471.84 1495.46,476.28 1495.46,586.28 1495.67,590.69 1497.39,599.34 1500.77,607.49 1505.67,614.82 1511.91,621.06 1519.24,625.96 1527.39,629.34 1536.05,631.06 1540.46,631.28 3010.46,631.28 3016.37,631.27 3027.96,633.58 3038.88,638.1 3048.71,644.67 3057.06,653.03 3063.63,662.85 3068.15,673.77 3070.46,685.37 3070.46,691.28 3070.46,1121.32 3070.45,1124.98 3069.03,1132.09 3066.24,1138.84 3062.18,1144.92 3057.01,1150.08 3050.94,1154.14 3044.19,1156.94 3037.02,1158.36 3033.37,1158.36 2930.54,1158.36 2926.78,1158.36 2919.4,1156.9 2912.45,1154.02 2906.2,1149.84 2900.88,1144.52 2896.7,1138.27 2893.82,1131.32 2892.36,1123.94 2892.36,1120.18 2892.36,978.66 2892.18,975 2890.75,967.81 2887.94,961.04 2883.87,954.94 2878.69,949.76 2872.59,945.69 2865.82,942.89 2858.63,941.46 2854.97,941.28 2555.64,941.28 ccw(c2555.64,899.2) 2513.56,899.2 2513.56,776.2 cw(c2483.64,776.2) 2483.64,746.28 1995.46,746.28 1990.98,746.5 1982.2,748.24 1973.93,751.67 1966.48,756.64 1960.15,762.97 1955.18,770.42 1951.75,778.69 1950,787.47 1949.78,791.95 1949.78,1109.35 1949.57,1113.07 1948.75,1117.2 1946.72,1122.1 1943.77,1126.51 1940.02,1130.26 1935.61,1133.21 1930.71,1135.24 1925.51,1136.28 1922.85,1136.28 1823.42,1136.28 1820.6,1136.28 1815.09,1135.18 1809.89,1133.02 1805.21,1129.9 1801.23,1125.92 1798.1,1121.24 1795.95,1116.04 1794.85,1110.52 1794.85,951.02 1794.71,948.08 1793.56,942.31 1791.31,936.88 1788.04,931.99 1783.89,927.83 1779,924.57 1773.56,922.32 1767.79,921.17 1764.85,921.02 1412.29,921.02 1404.39,919.45 1396.96,916.37 1390.27,911.9 1384.58,906.21 1380.11,899.52 1377.03,892.09 1375.46,884.2 1375.46,826.27 1375.24,822.08 1373.58,813.85 1370.35,806.1 1365.67,799.14 1359.73,793.21 1352.74,788.57 1344.97,785.37 1336.74,783.76 1332.54,783.56

## Silkscreen, mask and mechanical layers (free items; w line width, h text height)
Top Overlay:
  lines w5: 1271.87,2431.28 1585.46,2431.28 1585.46,2771.28 1480.55,2771.28 ; 1444.52,1382.72 1709.54,1382.72 1709.54,1274.36 ; 1715.07,1351.98 1778.04,1351.98 1778.04,1406.28 ; 2559.52,1382.72 2824.54,1382.72 2824.54,1274.36 ; 2830.07,1351.98 2893.04,1351.98 2893.04,1406.28
  lines w7: 1764.12,1405.85 1777.46,1405.85 ; 1764.12,1406.28 1764.12,1531.97 1987.68,1531.97 1987.68,1406.28 1778.04,1406.28 ; 2830.07,1351.98 2893.04,1351.98 2893.04,1406.28 3071.31,1406.28 3071.31,1523.02 2858.47,1523.02 2858.47,1473.02 ; 699.88,2611.33 699.88,2731 726,2731 817,2731 817,2938.03 943.95,2938.03 943.95,2611.33 699.88,2611.33
  text "POGO" at 2640.28,3071.88 h70
  text "NFC SPI INPUT" at 444.54,3053.47 h70
  text "NFC UART INPUT" at 1182.78,3053.47 h70
  text "1" at 966.53,2885.01 h70
  text "1" at 1562.87,2793.22 h70
  text "ANT" at 1076.94,2268.53 h60 r90
  text "NANO SIM" at 2928.84,2244.53 h70
  text "GNSS" at 3087.65,1875.49 h60 r90
  text "BOOT" at 2084.35,1608.12 h60
  text "GND   485_P   485_N   12V" at 432.47,656.59 h70
  text "GND   WBUS   HTR" at 1477.35,656.23 h70
  text "GND   WBUS   A_HTR" at 2464.24,656.23 h70
Bottom Overlay:
  text "Smart_Connect_Board_v1.0" at 2960,3148.33 h50
Board Outline:
  the board outline again, w10
Fabrication:
  drawing of 191 lines, arcs and shapes, not listed
  text "Layer" at 4141.58,2944 h60
  text "Name" at 4551.49,2944 h60
  text "Material" at 5481.23,2944 h60
  text "Thickness" at 6341,2944 h60
  text "Constant" at 6990.84,2944 h60
  text "Board Layer Stack" at 7560.7,2944 h60
  text "Top Overlay" at 4551.49,2824 h60
  text "Top Solder" at 4551.49,2704 h60
  text "Solder Resist" at 5481.23,2704 h60
  text "0.025mm" at 6341,2704 h60
  text "3.5" at 6990.84,2704 h60
  text "1" at 4141.58,2584 h60
  text "Top Layer" at 4551.49,2584 h60
  text "0.035mm" at 6341,2584 h60
  text "Dielectric 1" at 4551.49,2464 h60
  text "FR-4" at 5481.23,2464 h60
  text "1.500mm" at 6341,2464 h60
  text "4.6" at 6990.84,2464 h60
  text "2" at 4141.58,2344 h60
  text "Bottom Layer" at 4551.49,2344 h60
  text "0.035mm" at 6341,2344 h60
  text "Bottom Solder" at 4551.49,2224 h60
  text "Solder Resist" at 5481.23,2224 h60
  text "0.025mm" at 6341,2224 h60
  text "3.5" at 6990.84,2224 h60
  text "Bottom Overlay" at 4551.49,2104 h60
  text "Total board thickness:" at 4141.58,1984 h60
  text "1.621mm" at 6341,1984 h60
Drill Drawing:
  circle w10: c-1489.94,4575.33 r33.33
  lines w10: -1523.28,4242 -1456.61,4242 -1456.61,4308.67 -1523.28,4308.67 -1523.28,4242 ; -1523.28,4408.67 -1506.61,4408.67 -1489.94,4392 -1473.28,4408.67 -1456.61,4408.67 -1473.28,4425.33 -1456.61,4442 -1473.28,4442 -1489.94,4458.67 -1506.61,4442 -1523.28,4442 -1506.61,4425.33 -1523.28,4408.67 ; -1523.28,4758.67 -1456.61,4758.67 -1489.94,4692 -1523.28,4758.67 ; -1523.28,4858.67 -1506.61,4858.67 -1506.61,4842 -1473.28,4842 -1473.28,4858.67 -1456.61,4858.67 -1456.61,4892 -1473.28,4892 -1473.28,4908.67 -1506.61,4908.67 -1506.61,4892 -1523.28,4892 -1523.28,4858.67 ; -1523.28,4992 -1489.94,5008.67 -1456.61,4992 -1473.28,5025.33 -1456.61,5058.67 -1489.94,5042 -1523.28,5058.67 -1506.61,5025.33 -1523.28,4992
  lines w15: -1583.07,4197 5457.03,4197 ; -1583.07,5097 5457.03,5097 ; -1032.19,4047 -1032.19,5247 ; -432.35,4047 -432.35,5247 ; 687.32,4047 687.32,5247 ; 1193.2,4047 1193.2,5247 ; 1927,4047 1927,5247 ; 3426.55,4047 3426.55,5247 ; 4016.4,4047 4016.4,5247 ; 4762.2,4047 4762.2,5247 ; -1583.07,4047 5457.03,4047 5457.03,5247 -1583.07,5247 -1583.07,4047
  text "Symbol" at -1493.07,5142 h72
  text "Count" at -987.19,5142 h72
  text "Hole Size" at -387.35,5142 h72
  text "Plated" at 732.32,5142 h72
  text "Hole Type" at 1238.2,5142 h72
  text "Drill Layer Pair" at 1972,5142 h72
  text "Via/Pad" at 3471.55,5142 h72
  text "Pad Shape" at 4061.4,5142 h72
  text "Template" at 4807.2,5142 h72
  text "2" at -987.19,4992 h60
  text "0.750mm (29.53mil)" at -387.35,4992 h60
  text "NPTH" at 732.32,4992 h60
  text "Round" at 1238.2,4992 h60
  text "Top Layer - Bottom Layer" at 1972,4992 h60
  text "Pad" at 3471.55,4992 h60
  text "Rectangle" at 4061.4,4992 h60
  text "s0hn75" at 4807.2,4992 h60
  text "4" at -987.19,4842 h60
  text "3.000mm (118.11mil)" at -387.35,4842 h60
  text "PTH" at 732.32,4842 h60
  text "Round" at 1238.2,4842 h60
  text "Top Layer - Bottom Layer" at 1972,4842 h60
  text "Pad" at 3471.55,4842 h60
  text "Rounded" at 4061.4,4842 h60
  text "c500h300" at 4807.2,4842 h60
  text "5" at -987.19,4692 h60
  text "0.950mm (37.40mil)" at -387.35,4692 h60
  text "PTH" at 732.32,4692 h60
  text "Round" at 1238.2,4692 h60
  text "Top Layer - Bottom Layer" at 1972,4692 h60
  text "Pad" at 3471.55,4692 h60
  text "(Mixed)" at 4061.4,4692 h60
  text "(Mixed)" at 4807.2,4692 h60
  text "9" at -987.19,4542 h60
  text "0.900mm (35.43mil)" at -387.35,4542 h60
  text "PTH" at 732.32,4542 h60
  text "Round" at 1238.2,4542 h60
  text "Top Layer - Bottom Layer" at 1972,4542 h60
  text "Pad" at 3471.55,4542 h60
  text "(Mixed)" at 4061.4,4542 h60
  text "(Mixed)" at 4807.2,4542 h60
  text "10" at -987.19,4392 h60
  text "1.600mm (62.99mil)" at -387.35,4392 h60
  text "PTH" at 732.32,4392 h60
  text "Round" at 1238.2,4392 h60
  text "Top Layer - Bottom Layer" at 1972,4392 h60
  text "Pad" at 3471.55,4392 h60
  text "Rounded" at 4061.4,4392 h60
  text "(Mixed)" at 4807.2,4392 h60
  text "247" at -987.19,4242 h60
  text "0.300mm (11.81mil)" at -387.35,4242 h60
  text "PTH" at 732.32,4242 h60
  text "Round" at 1238.2,4242 h60
  text "Top Layer - Bottom Layer" at 1972,4242 h60
  text "Via" at 3471.55,4242 h60
  text "Rounded" at 4061.4,4242 h60
  text "(Mixed)" at 4807.2,4242 h60
  text "277 Total" at -987.19,4092 h60

## Dimensions
3361.92,3243.39 to 3361.92,93.78 on Dimensions
-23.91,3085.91 to 3519.4,3085.91 on Dimensions